# Altium PCB PCB_ALTIUM_PRUEBA.PcbDoc
Units mm, origin at the board's own origin, x right, y up, seen from the top; angles counter-clockwise.
Board outline 55 x 55 mm, 2 copper layers (Top Layer, Bottom Layer); 17 components, 15 nets, 76 pads, 8 vias.
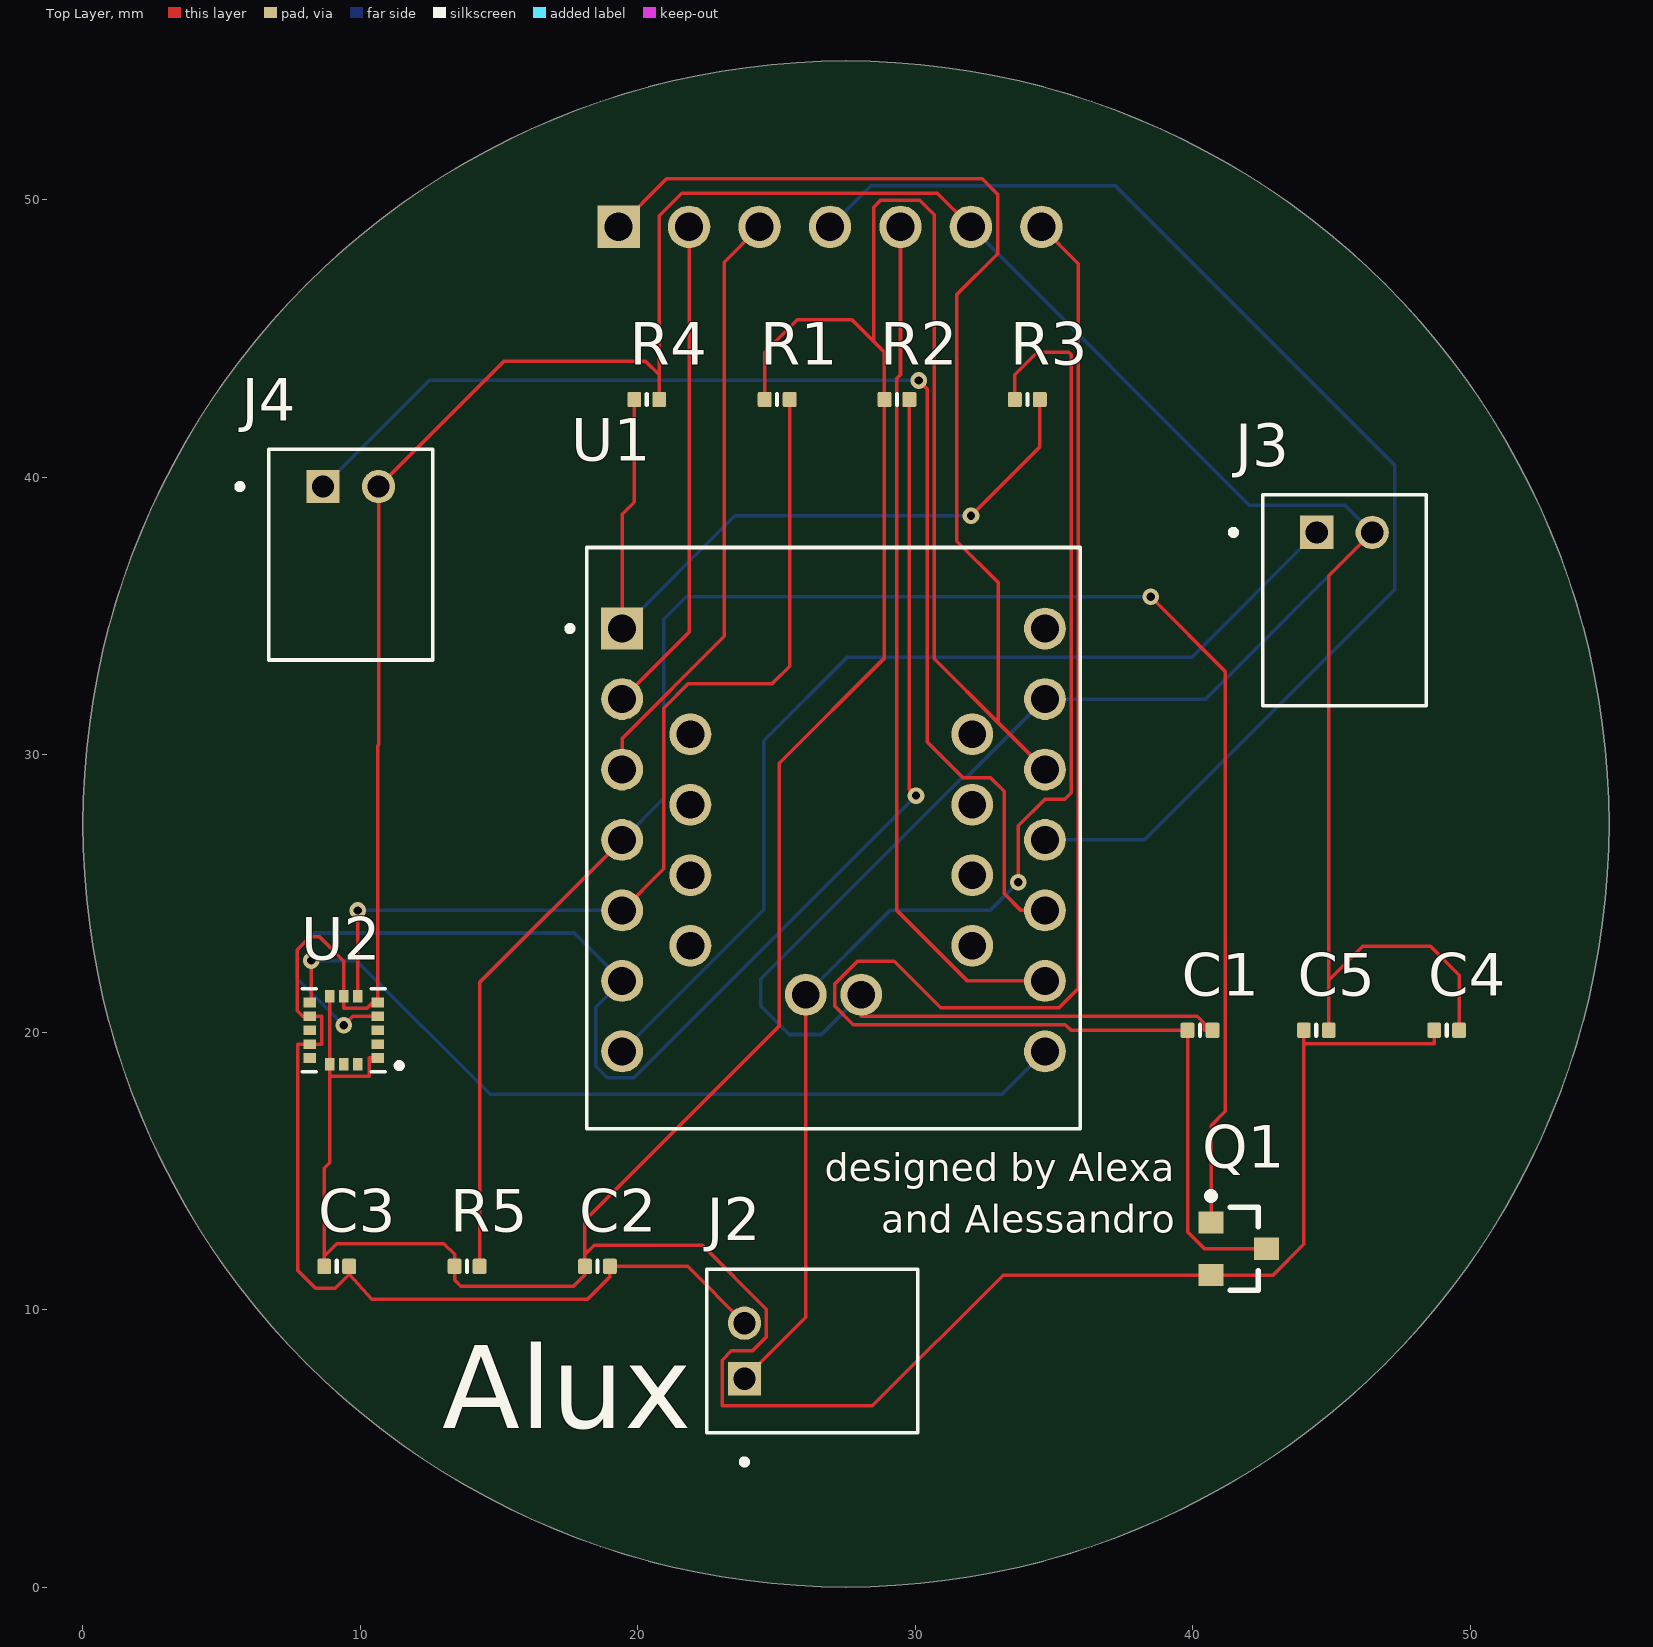
[diagram p0: Top Layer view]
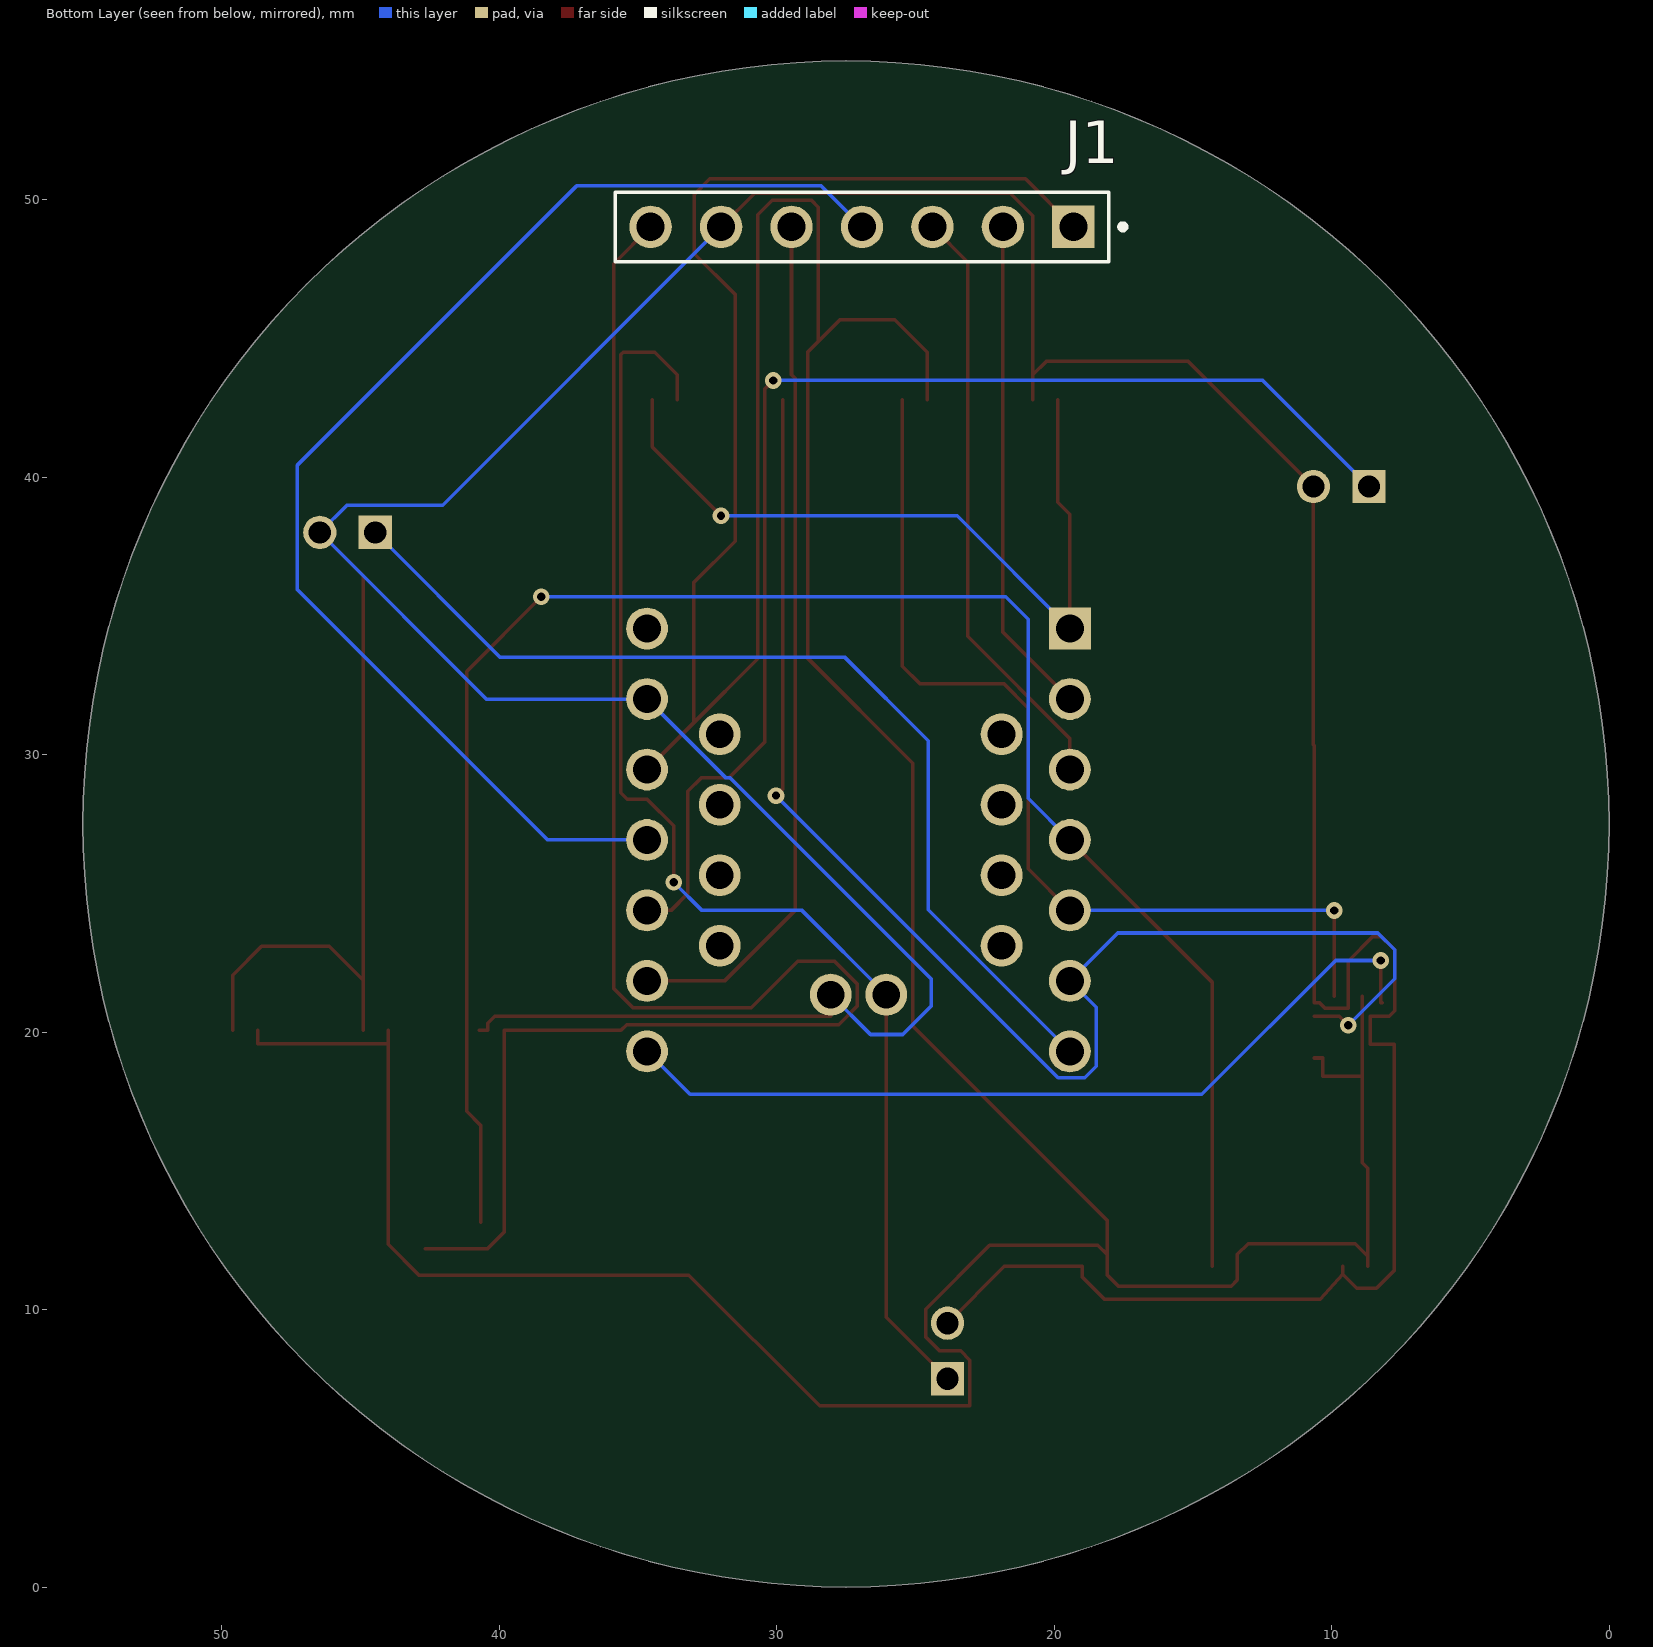
[diagram p1: Bottom Layer view, seen from below]
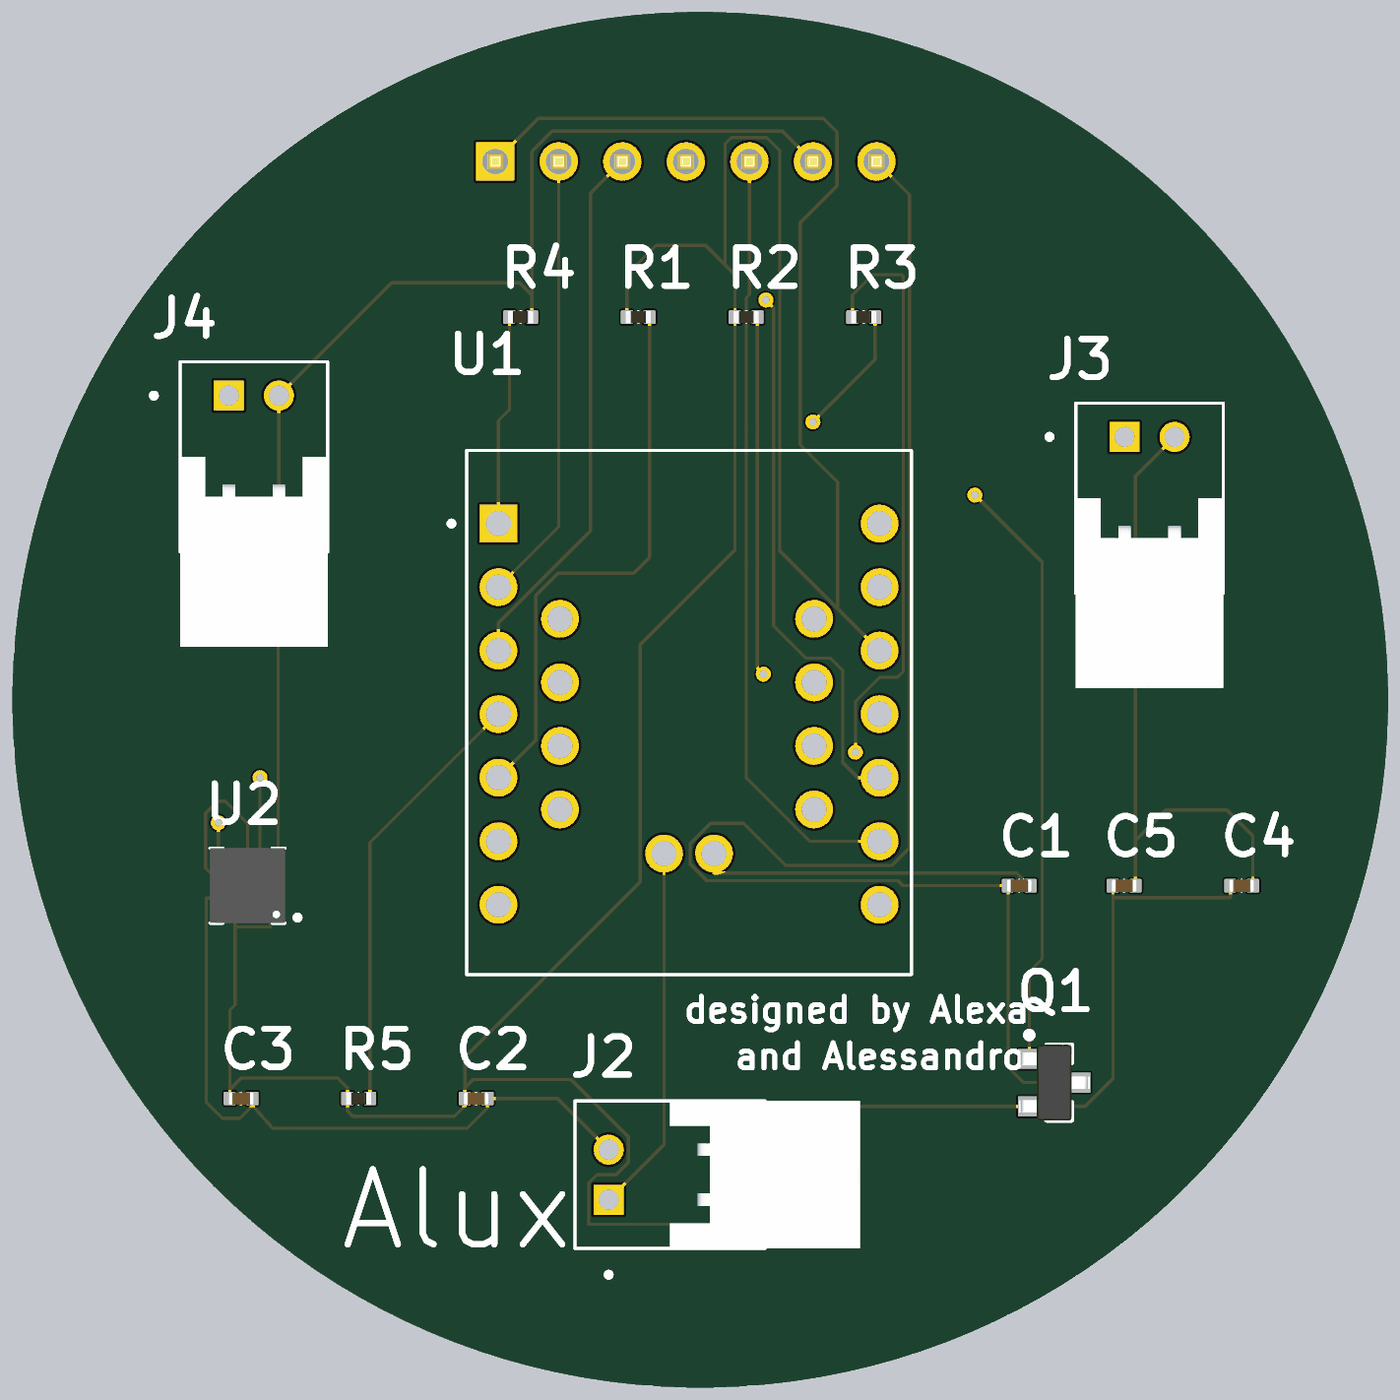
[diagram p2: 3D render of the assembled board from above, using the file's embedded part models]

## Layer stack, top to bottom
Top Solder: solder mask 0.0102, Solder Resist, Dk 3.5
Top Layer: signal copper 0.0356
Dielectric 1: dielectric 0.32, FR-4, Dk 4.8
Bottom Layer: signal copper 0.0356
Bottom Solder: solder mask 0.0102, Solder Resist, Dk 3.5

## Board outline
27.5,0 cw(c27.5,27.5) 0,27.5 cw(c27.5,27.5) 27.5,55 cw(c27.5,27.5) 55,27.5 cw(c27.5,27.5)

## Design rules (kind name [scope] priority, off if disabled: settings)
BoardOutlineClearance [All] p1: gap=0.2 ignorepadtopadclearanceinfootprint=FALSE
Clearance [All] p1: gap=0.127 ignorepadtopadclearanceinfootprint=FALSE except(0.25: Arc-Hole Track-Hole SMDPad-Hole THPad-Hole Via-Hole Fill-Hole Poly-Hole Region-Hole Text-Hole)
ComponentClearance [All] p1: gap=0.127 collisioncheckmode=3 verticalgap=0.127 showdistances=TRUE
DiffPairsRouting [All] p1: maxlimit=0.254 minlimit=0.127 mostfreqgap=0.127 toplayer_minwidth=0.127 toplayer_maxwidth=25.4 toplayer_prefwidth=0.127 bottomlayer_minwidth=0.127 bottomlayer_maxwidth=25.4 bottomlayer_prefwidth=0.127 maxuncoupledlength=12.7
Height [All] p1: minheight=0 maxheight=1816.048 prefheight=12.7
HoleSize [All] p1: absolutevalues=TRUE maxlimit=6.3 minlimit=0.3 maxpercent=80.000 minpercent=20.000
HoleToHoleClearance [All] p1: gap=0.25 allowstackedmicrovias=FALSE
MinimumAnnularRing [All] p1: minimumring=0.076
MinimumSolderMaskSliver [All] p1: minsoldermaskwidth=0
PlaneClearance [All] p1: clearance=0.127
PlaneConnect PlaneConnectPowerPads [InPadClass('PowerPads')] p1: planeconnectstyle=Direct reliefexpansion=0.508 reliefentries=4 reliefconductorwidth=0.254 reliefairgap=0.254
PlaneConnect [All] p2: pad.planeconnectstyle=Relief pad.reliefexpansion=0.3 pad.reliefentries=4 pad.reliefconductorwidth=0.127 pad.reliefairgap=0.127 via.planeconnectstyle=Direct via.reliefexpansion=0.3 via.reliefentries=4 via.reliefconductorwidth=0.127 via.reliefairgap=0.127
PolygonConnect PolygonConnectPowerPads [All vs (InPadClass('PowerPads'))] p1: connectstyle=Direct reliefconductorwidth=0.254 reliefentries=4 polygonreliefangle="90 Angle" airgapwidth=0.254
PolygonConnect [All] p2: thpad.connectstyle=Relief thpad.reliefconductorwidth=0.127 thpad.reliefentries=4 thpad.polygonreliefangle="90 Angle" thpad.airgapwidth=0.127 smdpad.connectstyle=Relief smdpad.reliefconductorwidth=0.127 smdpad.reliefentries=4 smdpad.polygonreliefangle="90 Angle" smdpad.airgapwidth=0.127 via.connectstyle=Direct via.reliefconductorwidth=0.127 via.reliefentries=4 via.polygonreliefangle="90 Angle" via.airgapwidth=0.127
RoutingVias [All] p1: holewidth=0.3 width=0.6 viastyle="Through Hole" minholewidth=0.3 minwidth=0.6 maxholewidth=0.6 maxwidth=6.6
SilkToSilkClearance [All] p1: silktosilkclearance=0
SilkToSolderMaskClearance [IsPad] p1: minsilkscreentomaskgap=0.127 clearancetoexposedcopper=TRUE
SolderMaskExpansion [All] p1: expansion=0.075 istentingtop=FALSE
Width [All] p1: maxlimit=25.4 minlimit=0.127 preferedwidth=0.127 minimp=50.000000 maximp=50.000000 favimp=50.000000
20 further rules are at their usual default settings.

## Components (designator, comment, footprint, x,y, rotation, side; value= is the part's Value field where it differs from the comment)
C1 "Capacitor 470pF +/-20% 50V 0402" CAPC0402(1005)60_L 40.259,20.066 r0 top value=100n
C2 "Capacitor 470pF +/-20% 50V 0402" CAPC0402(1005)60_L 18.542,11.557 r0 top value=100n
C3 "Capacitor 470pF +/-20% 50V 0402" CAPC0402(1005)60_L 9.144,11.557 r0 top value=100n
C4 "Capacitor 470pF +/-20% 50V 0402" CAPC0402(1005)60_L 49.149,20.066 r0 top value=10u
C5 "Capacitor 470pF +/-20% 50V 0402" CAPC0402(1005)60_L 44.45,20.066 r0 top value=100n
J1 "DS1021-1X7SF162-B" CONNFLY_DS1021-1X7SF162-B 26.924,49.022 r0 bottom
J2 "S2B-XH-A(LF)(SN)" JST_S2B-PH-K-S(LF)(SN) 26.289,8.509 r90 top
J3 "S2B-XH-A(LF)(SN)" JST_S2B-PH-K-S(LF)(SN) 45.466,35.56 r0 top
J4 "S2B-XH-A(LF)(SN)" JST_S2B-PH-K-S(LF)(SN) 9.652,37.211 r0 top
Q1 "BSS84LT1G" ONSC-SOT-23-3-318-08_V 41.656,12.192 r0 top
R1 "Resistor 953K +/-1 % 0402 63 mW" RESC0402(1005)_L 25.019,42.799 r0 top value=4k7
R2 "Resistor 953K +/-1 % 0402 63 mW" RESC0402(1005)_L 29.337,42.799 r0 top value=4k7
R3 "Resistor 953K +/-1 % 0402 63 mW" RESC0402(1005)_L 34.036,42.799 r0 top value=100k
R4 "Resistor 953K +/-1 % 0402 63 mW" RESC0402(1005)_L 20.32,42.799 r0 top value=100k
R5 "Resistor 953K +/-1 % 0402 63 mW" RESC0402(1005)_L 13.843,11.557 r0 top value=100k
U1 "XIAO_RP2350" MODULE_XIAO_RP2350 27.051,26.987 r0 top
U2 "LIS3DHTR" XDCR_LIS3DHTR 9.398,20.066 r180 top

## Footprints (in the part's own frame and the unit in brackets; to place one, negate y for a bottom-side part, rotate by r counter-clockwise, add the part's x,y. Pads: shape width x height; smd on the part's side, far side on the other; paste and mask are expansions set on the pad)
CAPC0402(1005)60_L [mm] "Chip Capacitor, Body 1.0x0.5mm, Height 0.6mm, IPC High Density"
  rrect25% 0.5x0.55 smd: 1(-0.45,0) 2(0.45,0)
  silkscreen extent 0,-0.2 0,0.2, body extent -0.5,-0.25 0.5,0.25, height 0.6
CONNFLY_DS1021-1X7SF162-B [mm]
  rect 1.53x1.53 / inner round 1.53 / far side rect 1.53x1.53 hole 1.02 mask+0.102: 1(-7.62,0)
  round 1.53 hole 1.02 mask+0.102: 2(-5.08,0) 3(-2.54,0) 4(0,0) 5(2.54,0) 6(5.08,0) 7(7.62,0)
  silkscreen extent -9.5,-1.25 8.89,1.25, body extent -8.89,-1.25 8.89,1.25, height 9
JST_S2B-PH-K-S(LF)(SN) [mm]
  rect 1.2x1.2 / inner round 1.2 / far side rect 1.2x1.2 hole 0.8 mask+0.102: 1(-1,2.45)
  round 1.2 hole 0.8 mask+0.102: 2(1,2.45)
  silkscreen extent -4.1,-3.8 2.95,3.8, body extent -2.95,-7.6 2.95,0, height 4.8
MODULE_XIAO_RP2350 [mm]
  round 1.508 hole 1 mask+0.102: 3V3(7.62,2.476) BAT_N(1,-5.638) BAT_P(-1,-5.638) D1(-7.62,5.016) D2(-7.62,2.476) D3(-7.62,-0.064) D4(-7.62,-2.603) D5(-7.62,-5.143) D6(-7.62,-7.683) D7(7.62,-7.683) D8(7.62,-5.143) D9(7.62,-2.603) D10(7.62,-0.064) D11(5.001,3.746) D12(5.001,1.206) D13(5.001,-1.333) D14(5.001,-3.873) D15(-5.159,-3.873) D16(-5.159,-1.333) D17(-5.159,1.206) D18(-5.159,3.746) GND(7.62,5.016) VUSB(7.62,7.556)
  rect 1.508x1.508 / inner round 1.508 / far side rect 1.508x1.508 hole 1 mask+0.102: D0(-7.62,7.556)
  silkscreen extent -9.6,-10.48 8.89,10.48
ONSC-SOT-23-3-318-08_V [mm] "SOT23, 3-Leads, Body 3.04x1.4mm, Pitch 0.95mm"
  rect 0.9x0.8 smd: 1(-1,0.95) 2(-1,-0.95) 3(1,0)
  silkscreen extent -1.12,-1.5 0.7,2.02, body extent -1.42,-1.52 1.42,1.52, height 1.11
RESC0402(1005)_L [mm] "Chip Resistor, Body 1.0x0.5mm, IPC High Density"
  rrect25% 0.5x0.55 smd: 1(-0.45,0) 2(0.45,0)
  silkscreen extent 0,-0.2 0,0.2, body extent -0.5,-0.25 0.5,0.25, height 0.3
XDCR_LIS3DHTR [mm]
  rect 0.45x0.35 smd paste-1 mask+0: 1(-1.225,1) 2(-1.225,0.5) 3(-1.225,0) 4(-1.225,-0.5) 5(-1.225,-1) 9(1.225,-1) 10(1.225,-0.5) 11(1.225,0) 12(1.225,0.5) 13(1.225,1)
  rect 0.35x0.45 smd paste-1 mask+0: 6(-0.5,-1.225) 7(0,-1.225) 8(0.5,-1.225) 14(0.5,1.225) 15(0,1.225) 16(-0.5,1.225)
  silkscreen extent -2.1,-1.5 1.5,1.5, body extent -1.5,-1.5 1.5,1.5, height 1

## Part data
C1 C2 C3 C4 C5: library part CMP-001-00068-4, "Chip Capacitor, 470pF +/-20%, 50V, 0402, Thickness 0.6 mm", Case/Package=0402, Max Operating Temperature=85°C, Min Operating Temperature=-55°C, Tolerance=20%, Voltage Rating=50V, Mounting Technology=SMT, Pins=2
J1: "Pin header; pin strips; male; PIN: 7; straight; 2.54mm; THT; 1x7", Package=None, Check_prices=https://www.snapeda.com/parts/DS1021-1X7SF162-B/Connfly/view-part/?ref=eda, MF=Connfly, MP=DS1021-1X7SF162-B, SnapEDA_Link=https://www.snapeda.com/parts/DS1021-1X7SF162-B/Connfly/view-part/?ref=snap
J2 J3 J4: library part S2B-PH-K-S(LF)(SN), "Connector Header Through Hole, Right Angle 2 position", Package="NON STANDARD-2 J.S.T.", Check_prices=https://www.snapeda.com/parts/S2B-PH-K-S(LF)(SN)/JST/view-part/?ref=eda, MF="JST Sales America Inc.", MP=S2B-PH-K-S(LF)(SN), SnapEDA_Link=https://www.snapeda.com/parts/S2B-PH-K-S(LF)(SN)/JST/view-part/?ref=snap
Q1: library part CMP-013-00012-4, "Power MOSFET Single P-Channel, -50 V, 10 Ohm, 3-Pin SOT-23, Pb-Free, Tape and Reel", Case/Package=SOT-23-3, Input Capacitance=30pF, Manufacturer="ON Semiconductor", Max Operating Temperature=150°C, Min Operating Temperature=-55°C, Nominal Dual Supply Voltage=5V, Package Description="3-Pin Small Outline Transistor, Body 2.9 x 1.3 mm, Pitch 0.95 mm", Package Quantity=3000, Package Reference="SOT-23 (318-08)", Power=225mW, Datasheet URL=http://www.onsemi.com/pub_link/Collateral/BSS84LT1-D.PDF, Datasheet Version="Rev. 9, 10/2016", Elements=1, Mounting Technology=SM, Nominal Vgs=-10V, Packaging=TapeandReel, Pins=3, Rds On Max=10Ohm, RoHS Compliant=True, Typical Rise Time=1ns
R1 R2 R3 R4 R5: library part CMP-009-00125-3, "Chip Resistor, 953 kOhms, +/-1 %, 63 mW, -55 to 155 degC, 0402", Case/Package=0402, Max Operating Temperature=155°C, Min Operating Temperature=-55°C, Power=63mW, Tolerance=1%, Pins=2
U1: "RP2350 Seeeduino XIAO - ARM Cortex-M33 MCU 32-Bit Embedded Evaluation Board", Package=None, Check_prices=https://www.snapeda.com/parts/XIAO%20RP2350/Seeed+Studio/view-part/?ref=eda, MF="Seeed Studio", MP="XIAO RP2350", SnapEDA_Link=https://www.snapeda.com/parts/XIAO%20RP2350/Seeed+Studio/view-part/?ref=snap
U2: "Accelerometer X, Y, Z Axis Â±2g, 4g, 8g, 16g 0.5Hz ~ 625Hz 16-LGA (3x3)", Package="LGA-16 STMicroelectronics", Check_prices=https://www.snapeda.com/parts/LIS3DHTR/STMicroelectronics/view-part/278195/?ref=eda, Digi-Key_Part_Number=497-10613-1-ND, MF=STMicroelectronics, MP=LIS3DHTR, SnapEDA_Link=https://www.snapeda.com/parts/LIS3DHTR/STMicroelectronics/view-part/278195/?ref=snap

## Via types
v1: diameter 0.6, hole 0.3, Top Layer to Bottom Layer, 8 vias

## Nets (pads, with @x,y where several pads share a name; then routed paths per layer and width w, separated by ;. In a path a pad name is that pad's centre, name@x,y a point inside that pad or via, vN(x,y) a via of type N, cw(c..) or ccw(c..) an arc to the next point about the centre after c; other vN are vias at no path point)
+3V3: C2.1 C3.1 C4.1 C5.1 J1.1 Q1.2 R1.1 R2.1 R5.1 U1.3V3 U2.1 U2.8 U2.14 | length 180.2
  Top Layer w0.127: C3.1 8.694,11.927 ; U2.8 U2.14 8.898,18.415 ; U2.1 10.312,19.066 10.312,18.415 8.898,18.415 ; J1.1 21.031,50.749 32.41,50.749 32.969,50.19 32.969,48.057 31.496,46.584 31.496,37.694 32.995,36.195 32.995,31.14 ; R1.1 24.569,44.501 25.737,45.669 27.719,45.669 28.499,44.889 ; U1.3V3 32.995,31.14 ; C5.1 44,19.587 ; C4.1 48.699,19.587 44,19.587 ; 8.694,11.927 8.694,15.088 8.898,15.292 8.898,18.415 ; 8.694,11.927 9.144,12.377 13.005,12.377 13.393,11.989 R5.1 13.393,11.067 13.614,10.846 17.678,10.846 18.092,11.259 C2.1 18.092,11.989 ; 18.092,11.989 18.092,13.215 25.095,20.218 25.095,29.693 28.887,33.484 R2.1 28.887,44.501 28.499,44.889 ; 18.092,11.989 18.422,12.319 22.327,12.319 24.63,10.016 24.63,9.009 24.13,8.509 23.368,8.509 23.038,8.179 23.038,6.528 28.448,6.528 33.162,11.242 Q1.2 42.89,11.242 44,12.352 44,19.587 ; 28.499,44.889 28.499,49.733 28.743,49.978 30.159,49.978 30.683,49.454 30.683,33.452 32.995,31.14
BAT_P: J2.1 R3.1 U1.BAT_P | length 47.6
  Top Layer w0.127: J2.1 26.051,9.721 U1.BAT_P ; R3.1 33.586,43.688 34.399,44.501 35.535,44.501 35.616,44.42 35.616,28.631 35.382,28.397 34.671,28.397 33.706,27.432 v1(33.706,25.4)
  Bottom Layer w0.127: U1.BAT_P 29.086,24.384 32.69,24.384 v1(33.706,25.4)
BTN1: J3.1 U1.D6 | length 36.4
  Bottom Layer w0.127: U1.D6 24.536,24.409 24.536,30.505 27.534,33.503 39.959,33.503 J3.1
BTN2: J4.1 U1.D9 | length 45.1
  Top Layer w0.127: v1(30.124,43.485) 30.429,43.18 30.429,30.455 31.725,29.159 32.715,29.159 33.198,28.677 33.198,24.994 33.807,24.384 U1.D9
  Bottom Layer w0.127: J4.1 12.476,43.485 v1(30.124,43.485)
DISP_CS: J1.2 U1.D1 | length 18
  Top Layer w0.127: U1.D1 21.844,34.417 J1.2
DISP_DC: J1.3 U1.D2 | length 21.6
  Top Layer w0.127: U1.D2 19.431,30.582 23.114,34.265 23.114,47.752 J1.3
DISP_PWR: Q1.1 R5.2 U1.D3 | length 67.8
  Top Layer w0.127: R5.2 14.293,21.786 U1.D3 ; v1(38.481,35.687) 41.173,32.995 41.173,17.145 40.656,16.628 Q1.1
  Bottom Layer w0.127: U1.D3 20.93,28.423 20.93,34.874 21.742,35.687 v1(38.481,35.687)
GND: C1.2 C2.2 C3.2 C4.2 C5.2 J1.6 J2.2 J3.2 J4.2 R4.2 U1.BAT_N U1.GND U2.5 U2.7 U2.10 U2.12 | length 180.1
  Top Layer w0.127: C3.2 9.594,11.27 ; R4.2 20.77,43.688 ; J2.2 21.791,11.557 C2.2 18.992,11.176 18.179,10.363 10.407,10.363 9.594,11.27 ; U1.BAT_N 28.051,20.574 40.157,20.574 40.411,20.32 40.411,20.066 C1.2 ; J1.6 30.794,50.232 21.58,50.232 20.77,49.421 20.77,43.688 ; C5.2 44.9,21.862 ; J3.2 44.9,36.444 44.9,21.862 ; C4.2 49.599,22.054 48.565,23.089 46.126,23.089 44.9,21.862 ; 9.594,11.27 9.093,10.77 8.382,10.77 7.747,11.405 7.747,19.566 U2.12 8.611,19.566 8.611,20.566 U2.10 7.925,20.566 7.722,20.769 7.722,22.962 8.204,23.444 8.509,23.444 9.398,22.555 U2.7 9.398,20.853 10.236,20.853 10.449,21.066 U2.5 10.623,30.328 10.652,30.357 J4.2 15.162,44.171 20.287,44.171 20.77,43.688
  Bottom Layer w0.127: U1.BAT_N 26.615,19.914 25.451,19.914 24.435,20.93 24.435,21.92 31.674,29.159 31.826,29.159 U1.GND 40.46,32.004 J3.2 45.487,38.989 42.037,38.989 J1.6
I2C_SCL: R2.2 U1.D5 U2.4 | length 51.2
  Top Layer w0.127: v1(9.398,20.244) 9.72,20.566 U2.4 ; R2.2 29.787,28.76 v1(30.023,28.524)
  Bottom Layer w0.127: v1(9.398,20.244) 7.722,21.92 7.722,22.962 8.331,23.571 17.704,23.571 U1.D5 18.486,20.899 18.486,18.771 18.898,18.359 19.858,18.359 v1(30.023,28.524)
I2C_SDA: R1.2 U1.D4 U2.6 | length 35.3
  Top Layer w0.127: U2.6 v1(9.898,24.384) ; U1.D4 20.93,25.883 20.93,31.674 21.819,32.563 24.841,32.563 25.469,33.191 R1.2
  Bottom Layer w0.127: v1(9.898,24.384) U1.D4
LIS_INT2: U1.D7 U2.9 | length 30.7
  Top Layer w0.127: U2.9 8.23,21.066 v1(8.23,22.581)
  Bottom Layer w0.127: v1(8.23,22.581) 9.855,22.581 14.681,17.755 33.122,17.755 U1.D7
SPI_MOSI: J1.4 U1.D10 | length 46
  Bottom Layer w0.127: J1.4 28.397,50.495 37.211,50.495 47.269,40.437 47.269,35.941 38.252,26.924 U1.D10
SPI_SCK: J1.5 U1.D8 | length 31.1
  Top Layer w0.127: J1.5 29.464,43.688 29.337,43.561 29.337,24.384 31.877,21.844 U1.D8
VBAT_DIV: R3.2 R4.1 U1.D0 | length 27.9
  Top Layer w0.127: U1.D0 19.431,38.659 19.87,39.098 R4.1 ; v1(32.004,38.608) 34.486,41.09 R3.2
  Bottom Layer w0.127: U1.D0 23.495,38.608 v1(32.004,38.608)
VCC_DISP: C1.1 J1.7 Q1.3 | length 62.3
  Top Layer w0.127: J1.7 35.87,47.696 35.87,21.569 35.179,20.879 30.912,20.879 29.235,22.555 27.915,22.555 27.102,21.742 27.102,20.93 27.762,20.269 35.408,20.269 35.611,20.066 C1.1 39.809,12.802 40.419,12.192 Q1.3
pads on no net: U1.D11 U1.D12 U1.D13 U1.D14 U1.D15 U1.D16 U1.D17 U1.D18 U1.VUSB U2.2 U2.3 U2.11 U2.13 U2.15 U2.16

## Silkscreen, mask and mechanical layers (free items; w line width, h text height)
Top Overlay:
  text "designed by Alexa" at 26.743,14.63 h1
  text "and Alessandro" at 28.775,12.773 h1
  text "Alux" at 12.954,5.715 h3
Mechanical 1:
  circle w0.254: c27.5,27.5 r27.5